# EAGLE board Terrific Uusam-Kup (EAGLE 9.7.0)

Size 177.28 x 114.14 mm. Coordinates in mm from the lower left corner, seen from the top.
Outline: 0,0 177.28,0 177.28,114.14 0,114.14 0,0
Copper layers (1*16): Top 0.035mm / dielectric 1.5mm / Bottom 0.035mm
Design rules "default": minimum track width 6mil, minimum drill 0.35mm, track to track 6mil, track to pad 6mil, pad to pad 6mil, via to via 6mil, smd to smd 6mil, copper to edge 40mil, drill to drill 6mil, minimum pad ring 10mil, minimum via ring 8mil, stop-mask expansion 4mil, vias tented up to drill 0mil, thermal gap 10mil

## Footprints (pad centres in the part's own frame; a part is rotated, then mirrored left to right if it is on the bottom)
LEDRD254W60D565H860B_G = drill 0.981 pad 1.581: 1 -1.27,0; 2 1.27,0
RESAD1016W63L850D250B = drill 0.83 pad 1.43: 1 -5.08,0; 2 5.08,0
SWITCH-MOMENTARY-PTH-6.5MM = drill 1.016 pad 1.88: 1 -3.251,2.261; 2 3.251,2.261; 3 -3.251,-2.261; 4 3.251,-2.261
ARDUINO-UNO-R3-SHIELD = drill 1.016 pad 1.88: 3.3V 24.13,-2.54; 5V 24.13,0; A0 24.13,12.7; A1 24.13,15.24; A2 24.13,17.78; A3 24.13,20.32; A4 24.13,22.86; A5 24.13,25.4; AREF -24.13,-13.97; D2 -24.13,20.32; D3 -24.13,17.78; D4 -24.13,15.24; D5 -24.13,12.7; D6 -24.13,10.16; D7 -24.13,7.62; D8 -24.13,3.81; D9 -24.13,1.27; D10 -24.13,-1.27; D11 -24.13,-3.81; D12 -24.13,-6.35; D13 -24.13,-8.89; GND@0 24.13,2.54; GND@1 24.13,5.08; GND@2 -24.13,-11.43; IOREF 24.13,-7.62; NC 24.13,-10.16; RES 24.13,-5.08; RX -24.13,25.4; SCL -24.13,-19.05; SDA -24.13,-16.51; TX -24.13,22.86; VIN 24.13,7.62
LEDRD254W51D580H541B = drill 0.921 pad 1.521: A -1.27,0; C 1.27,0
LCD-I2C = drill 1.016 long: 1 -19.05,-5.08; 2 -19.05,-7.62; 3 -19.05,-10.16; 4 -19.05,-12.7

## Placement (x,y rotation side)
D1  GREEN  [LEDRD254W60D565H860B_G]  85.34,53.42 270 top
D2  GREEN  [LEDRD254W60D565H860B_G]  85.34,38.18 270 top
D3  GREEN  [LEDRD254W60D565H860B_G]  85.34,22.94 270 top
R1  330  [RESAD1016W63L850D250B]  87.88,16.59 90 top
R2  330  [RESAD1016W63L850D250B]  87.88,31.83 90 top
R3  330  [RESAD1016W63L850D250B]  87.88,47.07 90 top
R4  50k  [RESAD1016W63L850D250B]  70.1,8.97 90 top
S1  SWITCH_MOMENTARY  [SWITCH-MOMENTARY-PTH-6.5MM]  20.95,23.31 90 top
S2  SWITCH_MOMENTARY  [SWITCH-MOMENTARY-PTH-6.5MM]  8.26,23.31 90 top
S3  SWITCH_MOMENTARY  [SWITCH-MOMENTARY-PTH-6.5MM]  8.26,8.07 90 top
U1  ARDUINO-UNO-R3-SHIELD  [ARDUINO-UNO-R3-SHIELD]  147.43,66.26 180 top
U2  PHOTODIODE  [LEDRD254W51D580H541B]  70.1,53.42 270 top
U3  PHOTODIODE  [LEDRD254W51D580H541B]  70.1,38.18 270 top
U4  PHOTODIODE  [LEDRD254W51D580H541B]  70.1,22.94 270 top
U6  LCD-16X2-I2CSUNFOUNDER-IIC  [LCD-I2C]  38.41,106.44 0 top

## Library data of the parts
D1-D3 = Tinkercad; CATEGORY: Opto-Electronic; SUB-CATEGORY: LED; VALUE: LED_GREEN
R1-R4 S1-S3 U1-U4 U6 = Tinkercad

## Nets
D1_C: D1.2 R3.2
D2_C: D2.2 R2.2
D3_C: D3.2 R1.2
U1_5V: D1.1 D2.1 D3.1 U1.5V U2.A U3.A U4.A U6.2
U1_A0: R4.2 U1.A0 U2.C U3.C U4.C
U1_A4: U1.A4 U6.3
U1_A5: U1.A5 U6.4
U1_D2: R4.1 S1.1 S1.2 S1.3 S1.4 S2.1 S2.2 S2.3 S2.4 S3.1 S3.2 S3.3 S3.4 U1.D2 U1.D11 U1.D12 U1.GND@0 U1.GND@1 U1.GND@2 U6.1
U1_D3: R1.1 R2.1 R3.1 U1.D3

## Tracks (layer width: path | path; a pad name or v marks a point on that pad's centre or on a via)
D1_C  (1 unrouted)
D2_C  (1 unrouted)
D3_C  (1 unrouted)
U1_5V  (7 unrouted)
U1_A0  (4 unrouted)
U1_A4  (1 unrouted)
U1_A5  (1 unrouted)
U1_D2  (19 unrouted)
U1_D3  (3 unrouted)